# Altium PCB NB3000XN.PcbDoc (part 50 of 71)
Units mil, origin at the board's own origin, x right, y up, seen from the top; angles counter-clockwise.
Board outline 9527.56 x 6929.77 mil, 6 copper layers (Top Layer, GND+SHIELD, MidLayer1, MidLayer2, P2 - 3V3+5V0, Bottom Layer), stack 62.375 mil thick; 832 components, 1027 nets, 4655 pads, 4981 vias.
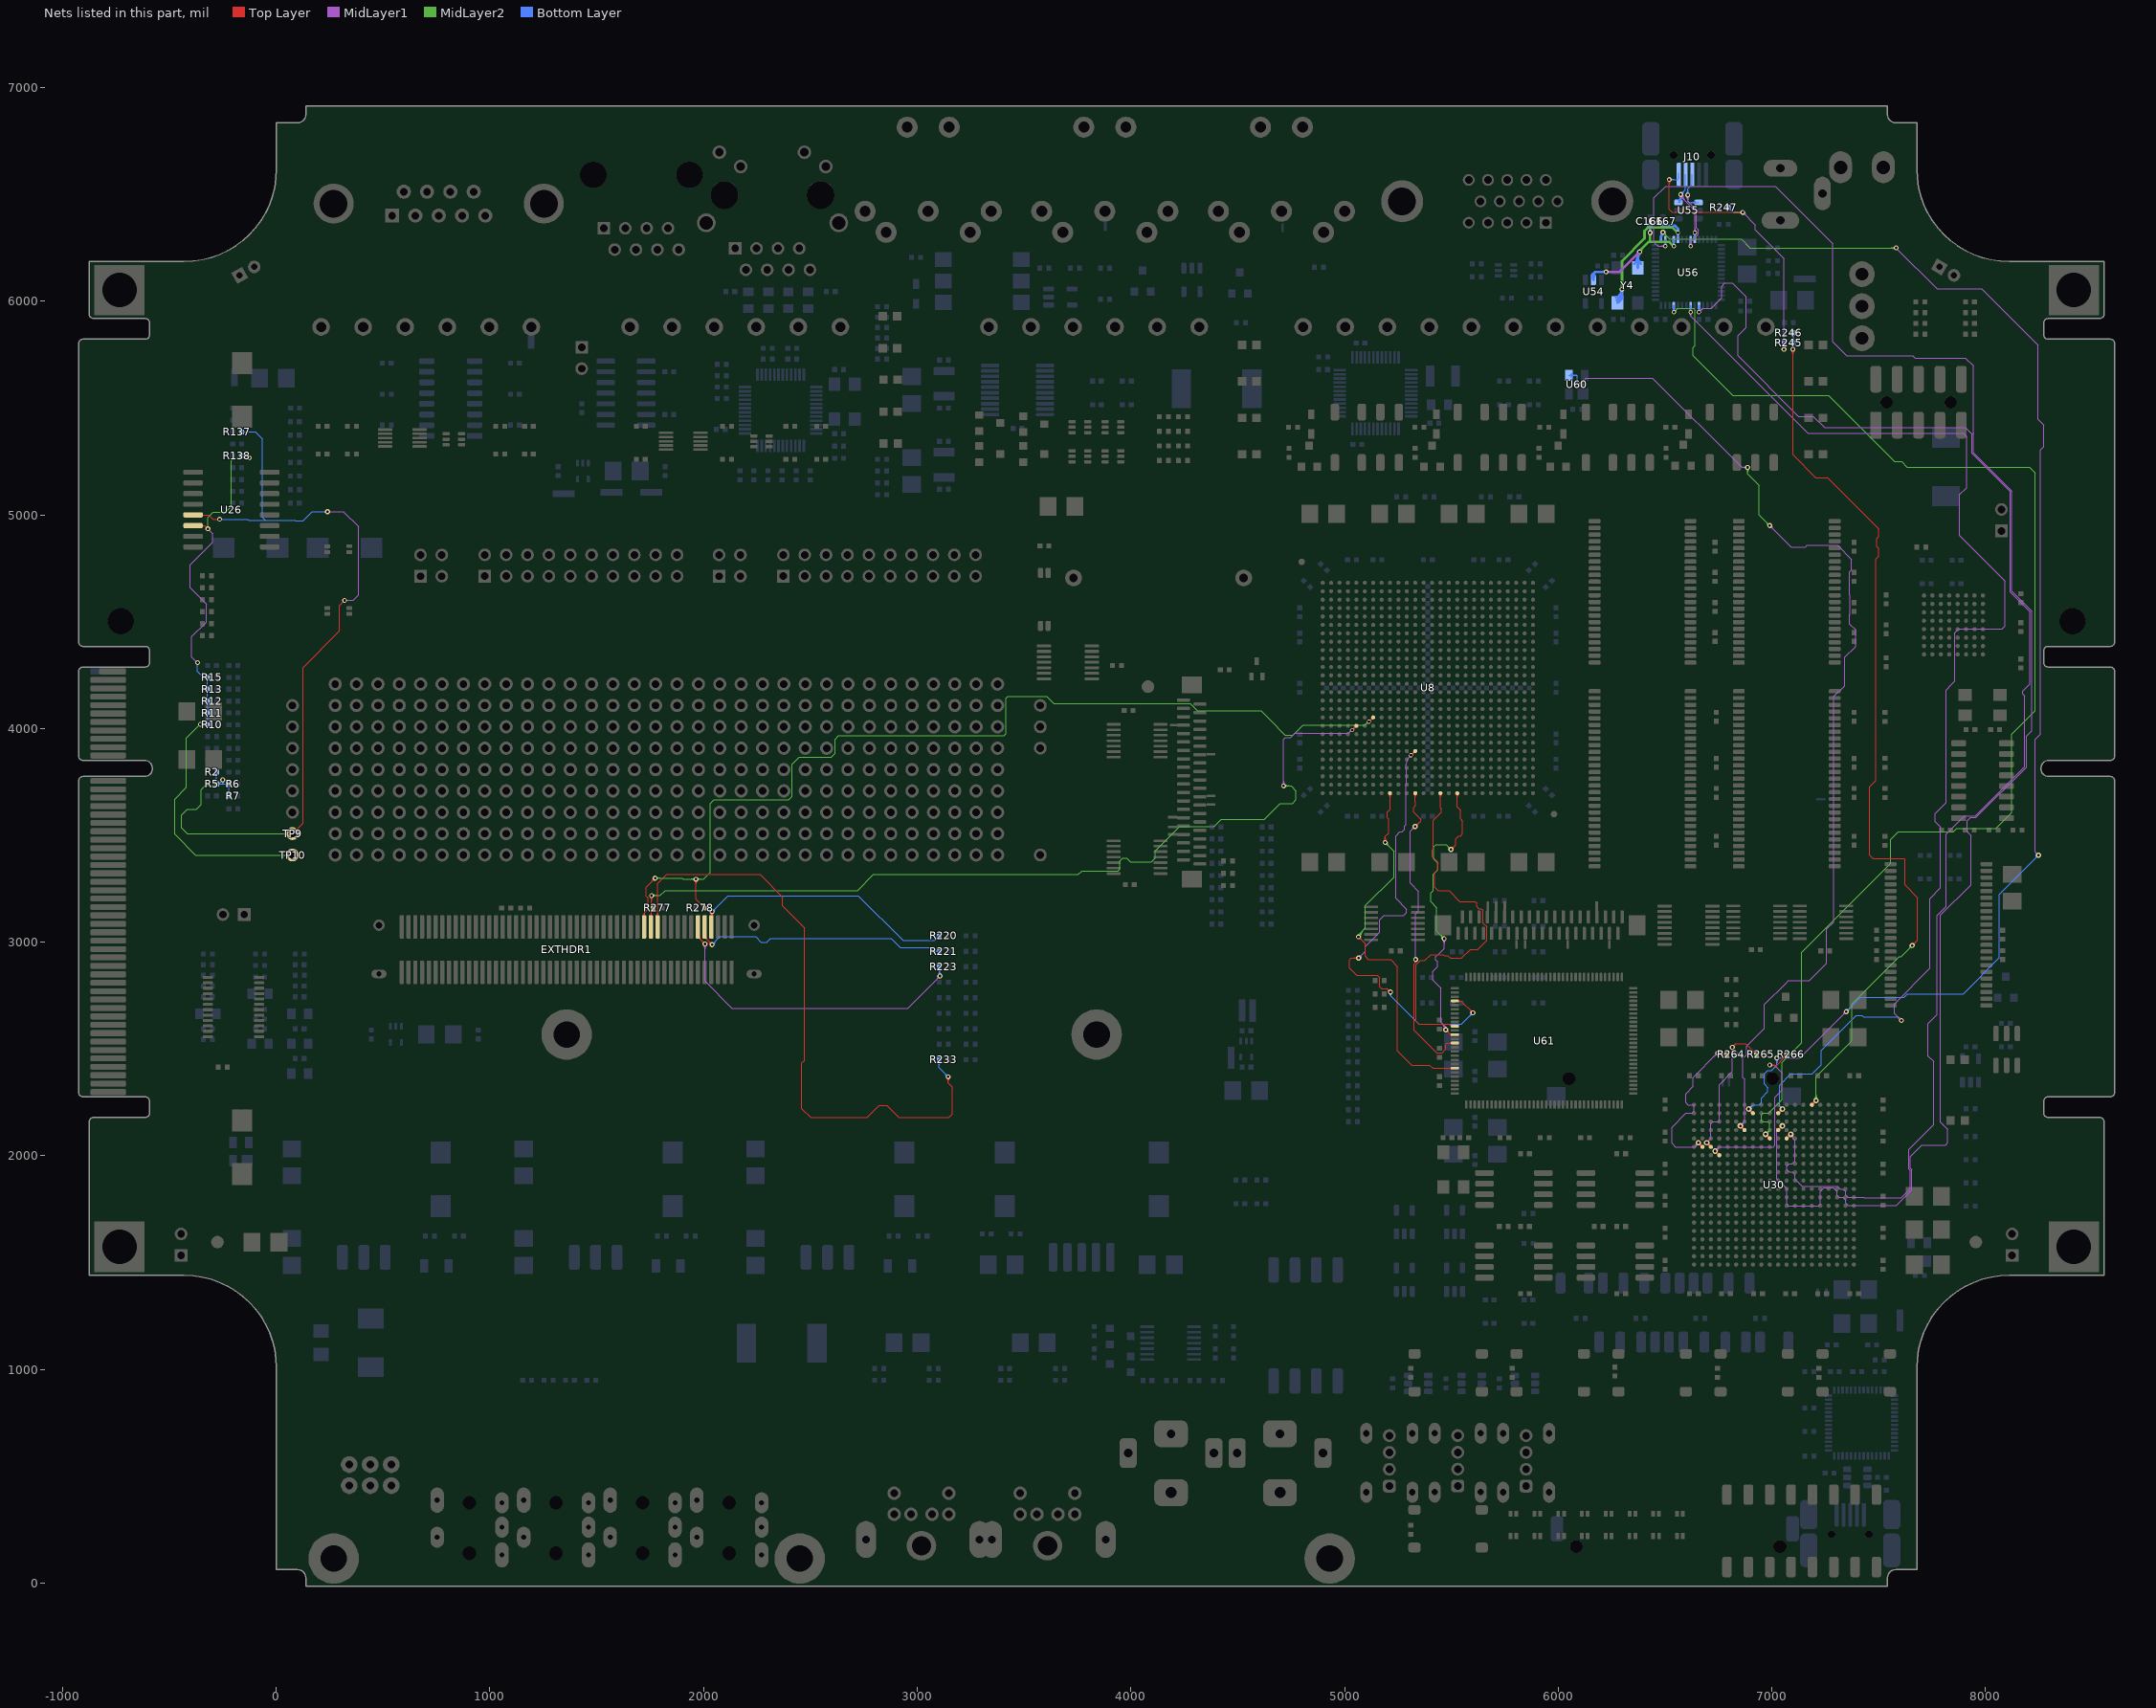
[diagram p54: the nets of this part, all layers, seen from the top]

## Via types
v1: diameter 23, hole 11.81, Top Layer to Bottom Layer, 3672 vias
v2: diameter 26, hole 11.81, Top Layer to Bottom Layer, 461 vias
v3: diameter 19, hole 11.81, Top Layer to Bottom Layer, tented both sides, 396 vias
v4: diameter 23.62, hole 11.81, Top Layer to Bottom Layer, 288 vias
v5: diameter 20, hole 11.81, Top Layer to Bottom Layer, 91 vias
v6: diameter 23, hole 11.81, Top Layer to Bottom Layer, tented both sides, 50 vias
v7: diameter 31, hole 11.81, Top Layer to Bottom Layer, 15 vias
v8: diameter 27.56, hole 11.81, Top Layer to Bottom Layer, tented both sides, 4 vias
v9: diameter 29, hole 11.81, Top Layer to Bottom Layer, 3 vias
v10: diameter 21, hole 11.81, Top Layer to Bottom Layer, 1 vias

## Nets (pads, with @x,y where several pads share a name; then routed paths per layer and width w, separated by ;. In a path a pad name is that pad's centre, name@x,y a point inside that pad or via, vN(x,y) a via of type N, cw(c..) or ccw(c..) an arc to the next point about the centre after c; other vN are vias at no path point) (continued)
HOST_USB.PKTEND: U30.L5 U56.39 | length 6330.3
  Top Layer w8: v2@6970.63,2092.22 cw(c6970.63,2070.49) 6985.99,2085.86 cw(c7001.36,2101.22) v2@6979.63,2101.22 ; v2(6970.63,2101.22) U30.L5@6990.31,2081.54 ; U30.L5@6984.47,2081.54 ccw(c6970.37,2081.54) 6980.34,2091.51 ccw(c6990.31,2101.48) U30.L5@6990.31,2087.38
  MidLayer2 w4: v5(6541.1,5949.34) 6557.66,5965.9 6632.66,5965.9 6640.19,5958.37 6640.19,5792.37 6631.86,5784.04 6631.86,5744.69 6818.17,5558.37 7265.19,5558.37 7573.52,5250.04 7606.86,5250.04 7632.9,5224 8204.69,5224 8231.86,5196.83 8231.86,4082.75 8122.86,3973.75 8122.86,3607.71 8048.52,3533.37 7865.19,3533.37 7848.52,3516.71 7591.86,3516.71 7556.86,3481.71 7556.86,3369.08 7139.86,2952.08 7139.86,2530.06 7048.52,2438.73 7048.52,2263.71 6984.86,2200.04 6959.19,2200.04 6950.86,2191.71 6950.86,2161.71 6952.86,2159.71 6981.86,2159.71 6990.19,2151.37 6990.19,2120.78 v2(6970.63,2101.22) ; v5@6541.1,5957.34 ccw(c6541.1,5976.65) 6554.76,5963 ccw(c6568.42,5949.34) v5@6549.1,5949.34 ; v2@6970.63,2108.22 ccw(c6970.63,2125.12) 6982.58,2113.17 ccw(c6994.53,2101.22) v2@6977.63,2101.22 ; v2@6970.63,2112.22 ccw(c6970.63,2138.78) 6989.41,2120 ccw(c7008.18,2101.22) v2@6981.63,2101.22
  Bottom Layer w8: v5@6536.86,5953.58 ccw(c6526.62,5963.82) 6541.1,5963.82 ccw(c6555.59,5963.82) v5@6545.34,5953.58 ; v5(6541.1,5949.34) U56.39@6541.1,5980.67
HOST_USB.RD_N: U30.N2 U56.1 | length 7277.6
  Top Layer w8: v2@6891.89,2210.33 cw(c6891.89,2188.6) 6907.25,2203.97 cw(c6922.62,2219.33) v2@6900.89,2219.33 ; v2(6891.89,2219.33) U30.N2@6911.57,2199.65 ; U30.N2@6905.73,2199.65 ccw(c6891.63,2199.65) 6901.6,2209.62 ccw(c6911.57,2219.59) U30.N2@6911.57,2205.49
  MidLayer1 w4: v1(7023.52,2458.37) 7131.86,2458.37 v1(7348.52,2675.04) ; v1@7027.41,2454.49 cw(c7036.8,2445.1) 7036.8,2458.37 cw(c7036.8,2471.65) v1@7027.41,2462.26 ; v1@7030.24,2451.66 cw(c7046.46,2435.44) 7046.46,2458.37 cw(c7046.46,2481.31) v1@7030.24,2465.09 ; v1@7339.02,2675.04 cw(c7316.09,2675.04) 7332.31,2658.82 cw(c7348.52,2642.61) v1@7348.52,2665.54 ; v1@7343.02,2675.04 cw(c7329.75,2675.04) 7339.14,2665.65 cw(c7348.52,2656.26) v1@7348.52,2669.54 ; v1(7581.86,6250.04) 7773.52,6058.37 7981.63,6058.37 8245,5795 8245,5448.52 8273.52,5420 8273.52,5320 8256.86,5303.33 8256.86,3974.43 8231.52,3949.1 8231.52,3424.04 v1(8248.52,3407.04) ; v1@8239.02,3407.04 ccw(c8216.09,3407.04) 8232.31,3423.26 ccw(c8248.52,3439.48) v1@8248.52,3416.54 ; v1@8243.02,3407.04 ccw(c8229.75,3407.04) 8239.14,3416.43 ccw(c8248.52,3425.82) v1@8248.52,3412.54
  MidLayer2 w4: v1@6490.19,6313.87 cw(c6490.19,6290.94) 6506.41,6307.16 cw(c6522.63,6323.37) v1@6499.69,6323.37 ; v1@6490.19,6317.87 cw(c6490.19,6304.6) 6499.58,6313.99 cw(c6508.97,6323.37) v1@6495.69,6323.37 ; v1(6490.19,6323.37) 6521.86,6291.71 6856.86,6291.71 6898.52,6250.04 v1(7581.86,6250.04) ; v1@7575.14,6243.32 ccw(c7558.92,6227.11) 7558.92,6250.04 ccw(c7558.92,6272.98) v1@7575.14,6256.76 ; v1@7577.97,6246.15 ccw(c7568.58,6236.76) 7568.58,6250.04 ccw(c7568.58,6263.32) v1@7577.97,6253.93
  Bottom Layer w4: U56.1@6479.22,6303.09 ccw(c6472.39,6309.92) 6482.05,6309.92 ccw(c6491.7,6309.92) U56.1@6484.88,6303.09 ; U56.1@6482.05,6288.37 cw(c6516.09,6288.37) v1@6495.84,6315.74 ; U56.1@6482.05,6289.33 6482.05,6315.23 v1(6490.19,6323.37) ; U56.1@6482.05,6296.31 cw(c6510.22,6296.31) v1@6493.46,6318.95 ; U56.1@6482.05,6304.24 cw(c6504.35,6304.24) v1@6491.08,6322.17 ; 6482.05,6312.18 cw(c6498.47,6312.18) v1@6488.7,6325.38 ; v2(6891.89,2219.33) 6910.93,2238.37 6940.19,2238.37 6951.52,2249.71 6951.52,2269.71 6981.86,2300.04 6981.86,2320.04 6965.19,2336.71 6965.19,2383.37 6981.86,2400.04 6998.52,2400.04 7023.52,2425.04 v1(7023.52,2458.37) ; v2@6891.89,2226.33 ccw(c6891.89,2243.23) 6903.84,2231.28 ccw(c6915.79,2219.33) v2@6898.89,2219.33 ; v2@6891.89,2230.33 ccw(c6891.89,2256.89) 6910.67,2238.11 ccw(c6929.45,2219.33) v2@6902.89,2219.33 ; v1@7016.81,2451.66 cw(c7000.59,2435.44) 7023.52,2435.44 cw(c7046.46,2435.44) v1@7030.24,2451.66 ; v1@7019.64,2454.49 cw(c7010.25,2445.1) 7023.52,2445.1 cw(c7036.8,2445.1) v1@7027.41,2454.49 ; v1(7348.52,2675.04) 7415.19,2741.71 7618.17,2741.71 7635.17,2758.71 7895.88,2758.71 8065.19,2928.02 8065.19,3223.71 v1(8248.52,3407.04) ; v1@7348.52,2680.54 ccw(c7348.52,2693.82) 7357.91,2684.43 ccw(c7367.3,2675.04) v1@7354.02,2675.04 ; v1@7348.52,2684.54 ccw(c7348.52,2707.48) 7364.74,2691.26 ccw(c7380.96,2675.04) v1@7358.02,2675.04 ; v1@8239.02,3407.04 cw(c8216.09,3407.04) 8232.31,3390.82 cw(c8248.52,3374.61) v1@8248.52,3397.54 ; v1@8243.02,3407.04 cw(c8229.75,3407.04) 8239.14,3397.65 cw(c8248.52,3388.26) v1@8248.52,3401.54
HOST_USB.READY: U30.J5 U56.33 | length 6901
  Top Layer w8: U30.J5@7069.06,2081.54 v2(7088.74,2101.22) ; U30.J5@7069.06,2087.38 ccw(c7069.06,2101.48) 7079.03,2091.51 ccw(c7089,2081.54) U30.J5@7074.9,2081.54 ; v2@7079.74,2101.22 cw(c7058.01,2101.22) 7073.38,2085.86 cw(c7088.74,2070.49) v2@7088.74,2092.22
  MidLayer1 w4: v5(6659.21,5949.34) 6676.58,5966.71 6715.86,5966.71 6765.19,6016.04 6765.19,6070 6780.19,6085 6815,6085 6880,6020 6880,5877.69 6841,5838.69 6841,5744.49 7125.14,5460.35 7194.18,5460.35 7246.15,5408.37 7905.23,5408.37 7934.28,5379.32 7936,5377.6 7936,5287.56 8115.19,5108.37 8115.19,4640 8208.52,4546.67 8208.52,4208.73 8175,4175.2 8175,4162.13 8183.19,4153.94 8183.19,3822.13 8150.03,3788.97 7952.43,3591.37 7901.17,3591.37 7815.19,3505.39 7815.19,3166.71 7773.52,3125.04 7773.52,2661.08 7731.52,2619.08 7731.52,2467.04 7756.86,2441.71 7756.86,2145.71 7640.52,2029.37 7640.52,1939.22 7647.5,1932.25 7647.5,1846 7605,1803.5 7535,1803.5 7432.63,1803.5 7430,1806.13 7356.96,1806.13 7345.33,1817.76 7345.33,1832.13 7332.83,1844.63 7320.6,1844.63 7315.19,1850.04 7306.86,1858.37 7141.19,1858.37 7108.36,1891.21 7108.36,1911.62 7095.24,1924.74 7080.87,1924.74 7069.74,1935.87 7069.74,1951.61 7080.87,1962.74 7095.24,1962.74 7108.36,1975.86 7108.36,2072.27 7099.02,2081.6 7098.92,2081.6 7098.92,2091.04 v2(7088.74,2101.22) ; v5@6659.21,5957.34 ccw(c6659.21,5976.66) 6672.87,5963 ccw(c6686.52,5949.34) v5@6667.21,5949.34 ; v2@7088.44,2094.23 cw(c7087.98,2083.29) 7098.92,2083.29 ; v2@7088.61,2098.22 cw(c7088.15,2087.47) 7098.92,2087.47 ; v2@7088.78,2102.22 cw(c7088.33,2091.64) 7098.92,2091.64
  Bottom Layer w8: v5@6654.97,5953.58 ccw(c6644.73,5963.82) 6659.21,5963.82 ccw(c6673.7,5963.82) v5@6663.45,5953.58 ; v5(6659.21,5949.34) U56.33@6659.21,5980.67
HOST_USB.RESET_N: U30.P4 U60.3 | length 5349.1
  Top Layer w8: v2@6852.52,2131.59 cw(c6852.52,2109.86) 6867.88,2125.23 cw(c6883.25,2140.59) v2@6861.52,2140.59 ; v2(6852.52,2140.59) U30.P4@6872.2,2120.91 ; U30.P4@6866.36,2120.91 ccw(c6852.26,2120.91) 6862.23,2130.88 ccw(c6872.2,2140.85) U30.P4@6872.2,2126.75
  MidLayer1 w4: v1@6104.86,5620.21 ccw(c6104.86,5633.49) 6114.25,5624.1 ccw(c6123.64,5614.71) v1@6110.36,5614.71 ; 6104.86,5624.21 ccw(c6104.86,5647.14) 6121.07,5630.93 ccw(c6137.29,5614.71) v1@6114.36,5614.71 ; v1(6105,5610) 6105,5614.56 6104.86,5614.71 6130.15,5640 6441.29,5640 6858.92,5222.37 v1(6886.86,5222.37) ; v2(6852.52,2140.59) 6852.52,2141.71 6872.86,2162.04 6872.86,2358.37 6865.19,2366.04 6865.19,2457.37 6881.86,2474.04 6881.86,2514.34 6965.19,2597.67 6965.19,2708.37 7069.5,2812.68 7076.82,2820 7176.21,2820 7256.86,2900.65 7256.86,3061.35 7290.19,3094.69 7290.19,4149.69 7340.86,4200.36 7340.86,4333.48 7391.86,4384.48 7391.86,4461.83 7364.52,4489.16 7364.52,4533.37 7365.19,4534.04 7365.19,4625.04 7364.52,4625.71 7364.52,4732.71 7373.52,4741.71 7373.52,4791.71 7306.86,4858.37 7165.19,4858.37 7156.86,4850.04 7090.19,4850.04 7077.48,4862.75 v1(6990.19,4950.04) ; v2@6852.52,2147.59 ccw(c6852.52,2161.8) 6862.57,2151.75 ; v2@6852.52,2151.59 ccw(c6852.52,2175.46) 6869.4,2158.58 ; v2@6859.52,2140.59 cw(c6879.11,2140.59) 6865.26,2154.44 ; v2@6863.52,2140.59 cw(c6892.76,2140.59) 6872.08,2161.27 ; v1@6880.14,5215.66 ccw(c6863.92,5199.44) 6863.92,5222.37 ccw(c6863.92,5245.31) v1@6880.14,5229.09 ; v1@6882.97,5218.49 ccw(c6873.58,5209.1) 6873.58,5222.37 ccw(c6873.58,5235.65) v1@6882.97,5226.26 ; v1@6990.19,4940.54 cw(c6990.19,4917.61) 7006.41,4933.82 cw(c7022.63,4950.04) v1@6999.69,4950.04 ; v1@6990.19,4944.54 cw(c6990.19,4931.26) 6999.58,4940.65 cw(c7008.97,4950.04) v1@6995.69,4950.04
  MidLayer2 w4: v1@6880.14,5215.66 cw(c6863.92,5199.44) 6886.86,5199.44 cw(c6909.79,5199.44) v1@6893.57,5215.66 ; v1@6882.97,5218.49 cw(c6873.58,5209.1) 6886.86,5209.1 cw(c6900.14,5209.1) v1@6890.75,5218.49 ; v1(6886.86,5222.37) 6886.86,5191.71 6940.19,5138.37 6940.19,5000.04 v1(6990.19,4950.04) ; v1@6980.69,4950.04 ccw(c6957.76,4950.04) 6973.97,4966.26 ccw(c6990.19,4982.48) v1@6990.19,4959.54 ; v1@6984.69,4950.04 ccw(c6971.41,4950.04) 6980.8,4959.43 ccw(c6990.19,4968.82) v1@6990.19,4955.54
  Bottom Layer w4: U60.3@6049.65,5653.31 6086.69,5653.31 ; U60.3@6055.19,5647.94 cw(c6067.83,5635.73) 6067.83,5653.31 cw(c6067.83,5670.89) U60.3@6055.19,5658.67 ; U60.3@6058.07,5645.17 cw(c6077.26,5626.62) 6077.26,5653.31 cw(c6077.26,5680) U60.3@6058.07,5661.45 ; U60.3@6060.95,5642.39 cw(c6086.69,5617.51) 6086.69,5653.31 ; U60.3@6060.95,5664.23 ccw(c6086.69,5689.11) 6086.69,5653.31 ; v1(6105,5610) 6090,5625 6090,5650 6086.69,5653.31
HOST_USB.SLOE: U30.K2 U56.35 | length 5896.7
  Top Layer w8: U30.K2@7029.69,2199.65 v2(7049.37,2219.33) ; U30.K2@7029.69,2205.49 ccw(c7029.69,2219.59) 7039.66,2209.62 ccw(c7049.63,2199.65) U30.K2@7035.53,2199.65 ; v2@7040.37,2219.33 cw(c7018.64,2219.33) 7034.01,2203.97 cw(c7049.37,2188.6) v2@7049.37,2210.33
  MidLayer1 w4: v5@6614.57,5943.32 cw(c6604.41,5931.7) 6619.84,5931.7 ; v5(6619.84,5949.34) 6619.84,5931.7 ; v5@6625.11,5943.32 ccw(c6635.28,5931.7) 6619.84,5931.7 ; v1@7597.36,2633.37 ccw(c7574.42,2633.37) 7590.64,2649.59 ccw(c7606.86,2665.81) v1@7606.86,2642.87 ; v1@7601.36,2633.37 ccw(c7588.08,2633.37) 7597.47,2642.76 ccw(c7606.86,2652.15) v1@7606.86,2638.87 ; v1(7606.86,2633.37) 7573.19,2667.04 7573.19,2710.41 7740.52,2877.75 7740.52,3204.37 7790.19,3254.04 7790.19,3540 7765.19,3565 7765.19,3603.04 7815.19,3653.04 7815.19,4180.71 7842.89,4208.41 7856.52,4222.04 7856.52,4449.71 7865.19,4458.37 7873.52,4466.71 8077.23,4466.71 8090.52,4480 8090.52,4691.37 8065.19,4716.71 7879.5,4902.4 7879.5,5094.72 7912,5127.23 7912,5367.66 7896.29,5383.37 7168.17,5383.37 6619.84,5931.7
  Bottom Layer w4: v2(7049.37,2219.33) 7036.86,2231.84 7036.86,2331.04 7089.19,2383.37 7189.19,2383.37 7231.86,2426.04 7231.86,2494.37 7394.19,2656.71 7422.21,2656.71 7428.88,2650.04 ; 7428.92,2650 7428.88,2650.04 ; v1@7597.36,2633.37 ccw(c7574.42,2633.37) 7590.64,2649.59 ccw(c7606.86,2665.81) v1@7606.86,2642.87 ; v1@7601.36,2633.37 ccw(c7588.08,2633.37) 7597.47,2642.76 ccw(c7606.86,2652.15) v1@7606.86,2638.87 ; v1(7606.86,2633.37) 7590.19,2650.04 7428.88,2650.04
  Bottom Layer w8: v5@6615.6,5953.58 ccw(c6605.36,5963.82) 6619.84,5963.82 ccw(c6634.33,5963.82) v5@6624.09,5953.58 ; v5(6619.84,5949.34) U56.35@6619.84,5980.67
HOST_USB.VBUS: R245.1 R246.1 U30.F1 | length 4741.7
  Top Layer w4: v1@7091.81,5768.66 cw(c7075.59,5752.44) 7098.52,5752.44 cw(c7121.46,5752.44) v1@7105.24,5768.66 ; v1@7094.64,5771.49 cw(c7085.25,5762.1) 7098.52,5762.1 cw(c7111.8,5762.1) v1@7102.41,5771.49 ; v1(7098.52,5775.37) 7098.52,5281.48 7204.96,5175.04 7259.84,5175.04 7500.19,4934.69 7500.19,4898.01 7491.19,4889 7491.19,4851 7500.19,4841.99 7500.19,4807.73 7486.19,4793.73 7486.19,3756.04 7456.86,3726.71 7456.86,3408.37 7473.52,3391.71 7618.52,3391.71 7623.52,3386.71 7623.52,3267.39 7681.86,3209.06 7681.86,3009.71 v1(7656.86,2984.71) ; v1@7656.86,2990.21 ccw(c7656.86,3003.49) 7666.25,2994.1 ccw(c7675.64,2984.71) v1@7662.36,2984.71 ; v1@7656.86,2994.21 ccw(c7656.86,3017.14) 7673.07,3000.93 ccw(c7689.29,2984.71) v1@7666.36,2984.71
  Top Layer w8: U30.F1@7187.17,2239.02 v2(7206.85,2258.7) ; U30.F1@7187.17,2244.86 ccw(c7187.17,2258.96) 7197.14,2248.99 ccw(c7207.11,2239.02) U30.F1@7193.01,2239.02 ; v2@7197.85,2258.7 cw(c7176.12,2258.7) 7191.49,2243.34 cw(c7206.85,2227.97) v2@7206.85,2249.7
  MidLayer2 w4: v2@7199.07,2266.48 ccw(c7180.29,2285.26) 7206.85,2285.26 ccw(c7233.41,2285.26) v2@7214.63,2266.48 ; v2@7201.9,2263.65 ccw(c7189.95,2275.6) 7206.85,2275.6 ccw(c7223.75,2275.6) v2@7211.8,2263.65 ; v2(7206.85,2258.7) 7206.85,2370.35 7374.19,2537.69 7374.19,2710.37 7597.19,2933.37 7605.52,2933.37 v1(7656.86,2984.71) ; v1@7647.36,2984.71 cw(c7624.42,2984.71) 7640.64,2968.49 cw(c7656.86,2952.27) v1@7656.86,2975.21 ; v1@7651.36,2984.71 cw(c7638.08,2984.71) 7647.47,2975.32 cw(c7656.86,2965.93) v1@7656.86,2979.21
  Bottom Layer w4: v1@7091.81,5782.09 ccw(c7069.17,5804.72) R245.1@7101.18,5804.72 ; R245.1@7094.59,5797.92 cw(c7078.68,5782.01) 7101.18,5782.01 cw(c7123.68,5782.01) R245.1@7107.77,5797.92 ; R245.1@7094.59,5812.08 ccw(c7078.68,5827.99) 7101.18,5827.99 ccw(c7123.68,5827.99) R245.1@7107.77,5812.08 ; R246.1@7094.59,5845.42 cw(c7078.68,5829.51) 7101.18,5829.51 cw(c7123.68,5829.51) R246.1@7107.77,5845.42 ; v1@7094.64,5779.26 ccw(c7078.83,5795.07) R245.1@7101.18,5795.07 ; R245.1@7097.42,5800.75 cw(c7088.34,5791.67) 7101.18,5791.67 cw(c7114.02,5791.67) R245.1@7104.94,5800.75 ; R245.1@7097.42,5809.25 ccw(c7088.34,5818.33) 7101.18,5818.33 ccw(c7114.02,5818.33) R245.1@7104.94,5809.25 ; R246.1@7097.42,5848.25 cw(c7088.34,5839.17) 7101.18,5839.17 cw(c7114.02,5839.17) R246.1@7104.94,5848.25 ; v1(7098.52,5775.37) 7101.18,5778.03 R245.1@7101.18,5805 R246.1@7101.18,5852.5 ; 7101.18,5791.9 ccw(c7115.04,5791.9) v1@7105.24,5782.09
HOST_USB.WR_N: U30.K4 U56.2 | length 8106.8
  Top Layer w8: U30.K4@7029.69,2120.91 v2(7049.37,2140.59) ; U30.K4@7029.69,2126.75 ccw(c7029.69,2140.85) 7039.66,2130.88 ccw(c7049.63,2120.91) U30.K4@7035.53,2120.91 ; v2@7040.37,2140.59 cw(c7018.64,2140.59) 7034.01,2125.23 cw(c7049.37,2109.86) v2@7049.37,2131.59
  MidLayer1 w4: v5@6496.08,6252.34 ccw(c6482.42,6238.69) 6482.42,6258 ccw(c6482.42,6277.31) v5@6496.08,6263.66 ; v5(6501.73,6258) 6467.23,6258 6448.52,6276.71 6448.52,6483.52 6504,6539 7015.63,6539 7285,6269.63 7285,5810 7350,5745 7660,5745 7670,5735 7905,5735 7942.81,5697.19 7942.81,5381.8 7944,5380.61 ; v2@7038.37,2140.59 cw(c7011.81,2140.59) 7030.59,2121.81 cw(c7049.37,2103.03) v2@7049.37,2129.59 ; v2@7042.37,2140.59 cw(c7025.47,2140.59) 7037.42,2128.64 cw(c7049.37,2116.69) v2@7049.37,2133.59 ; v2(7049.37,2140.59) 7023.82,2115.04 7023.82,1891.41 7069.52,1845.71 7069.52,1775.04 7077.86,1766.71 7218.19,1766.71 7226.52,1775.04 7226.52,1833.37 7243.19,1850.04 7288.52,1850.04 7305.19,1833.37 7305.19,1816.04 7315.19,1806.04 7332.05,1806.04 7345.33,1792.76 7345.33,1778.39 7356.46,1767.26 7582.51,1767.26 7655.5,1840.25 7655.5,1935.56 7648.52,1942.54 7648.52,1996.71 7701.86,2050.04 7812.86,2050.04 7823.52,2060.71 7823.52,2125.04 7790.19,2158.37 7790.19,3126.37 7931.86,3268.04 7931.86,3500.04 7915.19,3516.71 7915.19,3569.37 7929.19,3583.37 7955.75,3583.37 8191.19,3818.82 8191.19,3965.33 8216.52,3990.67 8216.52,4549.98 8123.19,4643.31 8123.19,5111.69 7944,5290.88 7944,5380.61 ; 7944,5380.92 7944,5380.61
  Bottom Layer w8: v5@6497.49,6262.24 ccw(c6487.25,6272.49) 6501.73,6272.49 ccw(c6516.22,6272.49) v5@6505.97,6262.24 ; v5(6501.73,6258) U56.2@6501.73,6289.33
HOST_USB.XTALIN: C167.1 U56.5 Y4.3 | length 905.6
  MidLayer2 w12: v1@6294.64,6059.93 ccw(c6285.25,6069.32) 6298.52,6069.32 ccw(c6311.8,6069.32) v1@6302.41,6059.93 ; v1(6298.52,6056.04) 6298.52,6188.52 6404.39,6294.39 6404.39,6329.39 6420,6345 6536.45,6345 v5(6560.79,6320.66)
  Bottom Layer w8: v5@6556.54,6316.42 cw(c6546.3,6306.18) 6560.79,6306.18 cw(c6575.27,6306.18) v5@6565.03,6316.42 ; U56.5@6560.79,6289.33 v5(6560.79,6320.66)
  Bottom Layer w12: Y4.3@6270.85,6017.95 ccw(c6258.47,6056.04) v1(6298.52,6056.04) 6298.52,6014.52 Y4.3@6277.5,5993.5 ; Y4.3@6274.56,6006.53 ccw(c6263.84,6039.52) 6298.52,6039.52 ; Y4.3@6278.27,5995.12 ccw(c6269.21,6023) Y4.3@6298.52,6023 ; v1@6294.64,6052.15 cw(c6285.25,6042.76) 6298.52,6042.76 cw(c6311.8,6042.76) v1@6302.41,6052.15 ; C167.1@6490,6354.33 6545.67,6354.33 6560.79,6339.21 v5(6560.79,6320.66) ; C167.1@6494.11,6350.22 cw(c6504.03,6340.3) 6504.03,6354.33 cw(c6504.03,6368.36) C167.1@6494.11,6358.44
HOST_USB.XTALOUT: C166.1 U54.2 U56.4 Y4.1 | length 1026.5
  MidLayer1 w12: v1(6224.15,6137.69) 6287.84,6137.69 v1(6381.86,6231.71) ; v1@6228.04,6133.8 cw(c6237.43,6124.41) 6237.43,6137.69 cw(c6237.43,6150.97) v1@6228.04,6141.58 ; v1@6376.36,6231.71 cw(c6363.08,6231.71) 6372.47,6222.32 cw(c6381.86,6212.93) v1@6381.86,6226.21
  MidLayer2 w12: v1(6381.86,6231.71) 6381.86,6236.86 6423,6278 6430,6278 ; v1@6387.36,6231.71 cw(c6413.07,6231.71) 6394.89,6249.89 ; v1@6426.3,6317.15 cw(c6416.91,6307.76) 6430.19,6307.76 cw(c6443.47,6307.76) v1@6434.08,6317.15 ; v1(6430.19,6321.04) 6430.19,6278.19 6430,6278 ; v5(6541.1,6258) 6521.1,6278 6430,6278
  Bottom Layer w8: v5@6536.86,6262.24 ccw(c6526.62,6272.49) 6541.1,6272.49 ccw(c6555.59,6272.49) v5@6545.35,6262.24 ; v5(6541.1,6258) U56.4@6541.1,6289.33
  Bottom Layer w12: U54.2@6159.66,6110.77 cw(c6171,6117.41) 6161.71,6126.71 ; U54.2@6160.89,6118.01 ccw(c6150.97,6127.93) 6165,6127.93 ccw(c6179.03,6127.93) U54.2@6169.11,6118.01 ; U54.2@6165,6100.12 6165,6130 6172.69,6137.69 ; U54.2@6170.01,6116.84 cw(c6184.85,6125.53) 6172.69,6137.69 ; v1@6220.26,6133.8 ccw(c6210.87,6124.41) 6210.87,6137.69 ccw(c6210.87,6150.97) v1@6220.26,6141.58 ; v1(6224.15,6137.69) 6172.69,6137.69 ; Y4.1@6357.3,6175.7 ccw(c6320.59,6212.41) 6372.5,6212.41 ccw(c6424.41,6212.41) Y4.1@6387.7,6175.7 ; Y4.1@6372.5,6156.5 6372.5,6222.35 v1(6381.86,6231.71) ; 6372.5,6195.84 cw(c6417.73,6195.84) v1@6385.75,6227.82 ; 6372.5,6224.81 cw(c6388.76,6224.81) v1@6377.26,6236.3 ; C166.1@6425.89,6350.22 cw(c6415.97,6340.3) 6430,6340.3 cw(c6444.03,6340.3) C166.1@6434.11,6350.22 ; v1@6426.3,6324.93 ccw(c6417.37,6333.86) 6430,6333.86 ; 6430,6334.78 ccw(c6443.93,6334.78) v1@6434.08,6324.93 ; C166.1@6430,6354.33 6430,6321.23 v1(6430.19,6321.04)
HOST_VS0: R264.1 U30.W6 | length 992.6
  Top Layer w4: v1(6746.52,2481.37) 6765,2481.37 ; v1@6754.25,2475.85 cw(c6765,2468.16) 6765,2481.37 ; v1@6754.25,2486.9 ccw(c6765,2494.59) 6765,2481.37 ; R264.1@6781.07,2469.82 ccw(c6771.38,2463.33) 6771.38,2475 ; R264.1@6781.07,2480.18 cw(c6771.38,2486.67) 6771.38,2475 ; R264.1@6788.82,2475 6771.38,2475 ; 6765,2481.37 6771.38,2475
  Top Layer w8: v2@6655.67,2052.85 cw(c6655.67,2031.12) 6671.03,2046.49 cw(c6686.4,2061.85) v2@6664.67,2061.85 ; v2(6655.67,2061.85) U30.W6@6675.35,2042.17 ; U30.W6@6669.51,2042.17 ccw(c6655.41,2042.17) 6665.38,2052.14 ccw(c6675.35,2062.11) U30.W6@6675.35,2048.01
  MidLayer1 w4: 6642.52,2044.04 ccw(c6633.4,2053.17) v2@6645.42,2057.85 ; 6644.85,2046.37 cw(c6655.67,2035.55) v2@6655.67,2050.85 ; 6646.85,2048.37 ccw(c6639.63,2055.6) v2@6649.15,2059.31 ; v2(6655.67,2061.85) 6656.86,2061.85 6656.86,2058.37 6640.19,2041.71 6548.52,2041.71 6531.86,2058.37 6531.86,2133.37 6598.52,2200.04 6627.19,2200.04 6635.52,2208.37 6635.52,2236.71 6633.52,2238.71 6606.86,2238.71 6596.86,2248.71 6596.86,2290.04 6631.86,2325.04 6631.86,2366.71 v1(6746.52,2481.37) ; v1@6737.02,2481.37 cw(c6714.09,2481.37) 6730.31,2465.16 cw(c6746.52,2448.94) v1@6746.52,2471.87 ; v1@6741.02,2481.37 cw(c6727.75,2481.37) 6737.14,2471.99 cw(c6746.52,2462.6) v1@6746.52,2475.87
HOST_VS1: R265.1 U30.V6 | length 907.6
  Top Layer w4: v1(6815.19,2508.37) 6831.86,2525.04 6878.78,2525.04 R265.1@6928.82,2475 ; v1@6815.19,2513.87 ccw(c6815.19,2527.15) 6824.58,2517.76 ccw(c6833.97,2508.37) v1@6820.69,2508.37 ; v1@6815.19,2517.87 ccw(c6815.19,2540.81) 6831.41,2524.59 ccw(c6847.63,2508.37) v1@6824.69,2508.37 ; 6912.07,2491.75 ccw(c6928.82,2508.5) R265.1@6928.82,2484.81 ; 6913.26,2490.56 cw(c6898.19,2475.49) R265.1@6919.5,2475.49 ; R265.1@6918.9,2484.92 ccw(c6928.82,2494.84) R265.1@6928.82,2480.81 ; R265.1@6920.09,2483.73 cw(c6911.85,2475.49) R265.1@6923.5,2475.49
  Top Layer w8: v2@6695.04,2052.85 cw(c6695.04,2031.12) 6710.4,2046.49 cw(c6725.77,2061.85) v2@6704.04,2061.85 ; v2(6695.04,2061.85) U30.V6@6714.72,2042.17 ; U30.V6@6708.88,2042.17 ccw(c6694.78,2042.17) 6704.75,2052.14 ccw(c6714.72,2062.11) U30.V6@6714.72,2048.01
  MidLayer1 w4: v2(6695.04,2061.85) 6715.19,2082 6715.19,2152.04 6723.52,2160.37 6751.86,2160.37 6753.52,2162.04 6753.52,2333.37 6815.19,2395.04 v1(6815.19,2508.37) ; v1@6808.47,2501.66 cw(c6792.26,2485.44) 6815.19,2485.44 cw(c6838.13,2485.44) v1@6821.91,2501.66 ; v1@6811.3,2504.49 cw(c6801.91,2495.1) 6815.19,2495.1 cw(c6828.47,2495.1) v1@6819.08,2504.49
HOST_VS2: R266.1 U30.U7 | length 1108.6
  Top Layer w4: v1(6990.19,2425.04) 7023.52,2425.04 7060.19,2461.71 7068.82,2461.71 ; v1@6994.08,2421.15 cw(c7003.47,2411.76) 7003.47,2425.04 cw(c7003.47,2438.32) v1@6994.08,2428.93 ; v1@6996.91,2418.32 cw(c7013.13,2402.11) 7013.13,2425.04 cw(c7013.13,2447.98) v1@6996.91,2431.76 ; 7049.96,2451.48 ccw(c7026.93,2474.51) R266.1@7059.5,2474.51 ; 7056.79,2458.31 ccw(c7040.59,2474.51) R266.1@7063.5,2474.51 ; 7060.03,2461.55 cw(c7068.82,2452.76) R266.1@7068.82,2465.19 ; R266.1@7068.82,2475 7068.82,2461.71 ; 7068.82,2461.71 cw(c7072.95,2461.71) 7071.68,2465.64 ccw(c7072.95,2461.71) 7068.82,2461.71 ; 7068.82,2461.71 ccw(c7064.69,2461.71) 7065.96,2465.64 cw(c7064.69,2461.71) 7068.82,2461.71
  Top Layer w8: v2@6734.41,2013.48 cw(c6734.41,1991.75) 6749.77,2007.12 cw(c6765.14,2022.48) v2@6743.41,2022.48 ; v2(6734.41,2022.48) U30.U7@6754.09,2002.8 ; U30.U7@6748.25,2002.8 ccw(c6734.15,2002.8) 6744.12,2012.77 ccw(c6754.09,2022.74) U30.U7@6754.09,2008.64
  MidLayer1 w4: v2(6734.41,2022.48) 6753.64,2041.71 7006.9,2041.71 7015.19,2050 7015.19,2275.04 7048.52,2308.37 7048.52,2388.73 7012.21,2425.04 v1(6990.19,2425.04) ; v2@6734.41,2029.48 ccw(c6734.41,2046.38) 6746.36,2034.43 ccw(c6758.31,2022.48) v2@6741.41,2022.48 ; v2@6734.41,2033.48 ccw(c6734.41,2060.04) 6753.19,2041.26 ccw(c6771.96,2022.48) v2@6745.41,2022.48
HOSTUSB#.DMINUS: J10.2 U55.6 U56.9 | length 744.1
  MidLayer1 w4: v1@6571.02,6500.04 ccw(c6588.84,6500.04) 6576.24,6487.44 ; v1(6573.52,6500.04) 6573.52,6490.16 6639.53,6424.16 v5(6639.53,6320.66) ; v1@6575.02,6500.04 ccw(c6602.49,6500.04) 6583.07,6480.62 ; v1@6579.02,6500.04 ccw(c6616.15,6500.04) 6589.9,6473.79 ; v1@6583.02,6500.04 ccw(c6629.81,6500.04) 6596.73,6466.96 ; v5@6633.87,6326.32 ccw(c6620.21,6339.98) 6639.53,6339.98 ccw(c6658.84,6339.97) v5@6645.18,6326.32
  Bottom Layer w4: U55.6@6561.32,6471.62 ccw(c6538.71,6500) v1@6575,6500 ; U55.6@6562.76,6462.4 U55.6@6575,6474.65 ; U55.6@6563.81,6468.49 ccw(c6545.32,6491.7) v1@6575,6491.7 ; U55.6@6566.31,6465.36 ccw(c6551.94,6483.4) 6575,6483.4 ; v1@6567.01,6493.13 cw(c6549.54,6474.6) U55.6@6575,6474.6 ; U55.6@6568.8,6462.23 ccw(c6558.55,6475.1) U55.6@6575,6475.1 ; v1@6569.75,6496.04 cw(c6558.28,6483.87) 6575,6483.87 ; v1(6573.52,6500.04) 6596.5,6523.01 J10.2@6596.5,6594 ; v1@6573.52,6505.54 ccw(c6573.52,6518.82) 6582.91,6509.43 ccw(c6592.3,6500.04) v1@6579.02,6500.04 ; v1@6573.52,6509.54 ccw(c6573.52,6532.48) 6589.74,6516.26 ccw(c6605.96,6500.04) v1@6583.02,6500.04 ; U55.6@6575,6475.54 ccw(c6581.8,6475.54) U55.6@6576.99,6470.73 ; 6575,6480.67 cw(c6592.9,6480.67) v1@6580.24,6493.32 ; v1@6575,6500 U55.6@6575,6474.65
  Bottom Layer w8: v5@6635.28,6316.42 cw(c6625.04,6306.18) 6639.53,6306.18 cw(c6654.01,6306.18) v5@6643.77,6316.42 ; U56.9@6639.53,6289.33 v5(6639.53,6320.66)
HOSTUSB#.DPLUS: J10.3 U55.1 U56.8 | length 768.6
  MidLayer1 w4: v1@6599.47,6490.32 cw(c6583.26,6474.11) 6606.19,6474.11 cw(c6629.13,6474.11) v1@6612.91,6490.32 ; v1@6602.3,6493.15 cw(c6592.91,6483.76) 6606.19,6483.76 cw(c6619.47,6483.76) v1@6610.08,6493.15 ; v1(6606.19,6497.04) 6606.19,6468.81 6626.16,6448.84 6647.53,6427.47 6647.53,6343 6655.53,6335 6655.53,6314.03 6619.84,6278.35 v5(6619.84,6258) ; v5@6614.19,6263.66 ccw(c6600.53,6277.31) 6619.84,6277.31 ccw(c6639.16,6277.31) v5@6625.5,6263.66
  Bottom Layer w4: v1@6599.47,6490.32 cw(c6582.93,6473.78) 6606.33,6473.78 ; v1@6599.47,6503.76 ccw(c6583.26,6519.98) 6606.19,6519.98 ; v1@6602.3,6493.15 cw(c6592.58,6483.43) 6606.33,6483.43 ; v1@6602.3,6500.93 ccw(c6592.91,6510.32) 6606.19,6510.32 ccw(c6619.47,6510.32) v1@6610.08,6500.93 ; v1(6606.19,6497.04) 6606.33,6497.04 6606.33,6468.67 6612.6,6462.4 U55.1@6657.24,6462.4 ; 6606.33,6474.43 cw(c6628.8,6474.43) v1@6612.91,6490.32 ; 6606.33,6484.09 cw(c6619.14,6484.09) v1@6610.08,6493.15 ; v1@6612.91,6503.76 cw(c6629.13,6519.98) 6606.19,6519.98 ; J10.3@6627.99,6594 6627.99,6547.99 6606.19,6526.19 6606.19,6519.98 ; U55.1@6643.01,6454.07 ccw(c6622.9,6433.96) 6622.9,6462.4 ccw(c6622.9,6490.84) U55.1@6643.01,6470.73 ; U55.1@6645.84,6456.9 ccw(c6632.56,6443.62) 6632.56,6462.4 ccw(c6632.56,6481.18) U55.1@6645.84,6467.9
  Bottom Layer w8: v5@6615.6,6262.24 ccw(c6605.36,6272.49) 6619.84,6272.49 ccw(c6634.33,6272.49) v5@6624.09,6262.24 ; v5(6619.84,6258) U56.8@6619.84,6289.33
HOSTUSB#.VBUS: J10.1 R245.2 R247.1 | length 1801.4
  Top Layer w4: v1@6513.28,6563.28 cw(c6497.06,6547.06) 6520,6547.06 cw(c6542.93,6547.06) v1@6526.72,6563.28 ; v1@6516.11,6566.11 cw(c6506.72,6556.72) 6520,6556.72 cw(c6533.28,6556.72) v1@6523.89,6566.11 ; v1(6520,6570) 6520,6430 6533.29,6416.71 v1(6863.86,6416.71) ; v1@6857.14,6409.99 ccw(c6840.92,6393.77) 6840.92,6416.71 ccw(c6840.92,6439.64) v1@6857.14,6423.43 ; v1@6859.97,6412.82 ccw(c6850.58,6403.43) 6850.58,6416.71 ccw(c6850.58,6429.99) v1@6859.97,6420.6
  MidLayer1 w4: v1@6863.86,6407.21 cw(c6863.86,6384.27) 6880.07,6400.49 cw(c6896.29,6416.71) v1@6873.36,6416.71 ; v1@6863.86,6411.21 cw(c6863.86,6397.93) 6873.25,6407.32 cw(c6882.64,6416.71) v1@6869.36,6416.71 ; v1(6863.86,6416.71) 6923,6357.56 6923,6334.62 7056.86,6200.77 v1(7056.86,5775.04) ; v1@7050.14,5781.76 ccw(c7033.92,5797.98) 7056.86,5797.98 ccw(c7079.79,5797.98) v1@7063.57,5781.76 ; v1@7052.97,5778.93 ccw(c7043.58,5788.32) 7056.86,5788.32 ccw(c7070.14,5788.32) v1@7060.75,5778.93
  Bottom Layer w4: v1(6520,6570) 6560,6570 6565,6575 J10.1@6565,6600 ; v1@6523.89,6566.11 cw(c6533.28,6556.72) 6533.28,6570 cw(c6533.28,6583.28) v1@6523.89,6573.89 ; v1@6526.72,6563.28 cw(c6542.93,6547.06) 6542.93,6570 cw(c6542.93,6592.93) v1@6526.72,6576.72 ; R247.1@6795,6440 6818.29,6416.71 v1(6863.86,6416.71) ; R247.1@6796.18,6430.19 cw(c6796.18,6409.35) 6810.91,6424.09 ; R247.1@6796.18,6434.19 cw(c6796.18,6423.01) R247.1@6804.08,6430.92 ; R247.1@6801.5,6439.51 ccw(c6816,6439.51) R247.1@6805.75,6429.25 ; R247.1@6805.5,6439.51 ccw(c6829.66,6439.51) 6812.58,6422.42 ; v1@6857.14,6409.99 ccw(c6840.92,6393.77) 6840.92,6416.71 ccw(c6840.92,6439.64) v1@6857.14,6423.43 ; v1@6859.97,6412.82 ccw(c6850.58,6403.43) 6850.58,6416.71 ccw(c6850.58,6429.99) v1@6859.97,6420.6 ; R245.2@7055.54,5795.79 cw(c7053.75,5791.04) 7058.82,5791.04 ; v1(7056.86,5775.04) 7056.86,5789.08 7058.82,5791.04 ; R245.2@7058.82,5805 7058.82,5791.04 ; R245.2@7062.1,5795.79 ccw(c7063.89,5791.04) 7058.82,5791.04
I2C.SCL: EXTHDR1.25 R277.2 U8.V5 | length 4493.7
  Top Layer w4: EXTHDR1.25@1747.71,3122.62 ccw(c1725.64,3144.7) 1756.86,3144.7 ; v1@1750.14,3211.66 cw(c1733.92,3195.44) 1756.86,3195.44 cw(c1779.79,3195.44) v1@1763.57,3211.66 ; EXTHDR1.25@1750.54,3119.8 ccw(c1735.29,3135.04) 1756.86,3135.04 ; v1@1752.97,3214.49 cw(c1743.58,3205.1) 1756.86,3205.1 cw(c1770.14,3205.1) v1@1760.75,3214.49 ; EXTHDR1.25@1756.86,3075.04 v1(1756.86,3218.37) ; 1756.86,3127.86 ccw(c1764.26,3127.86) EXTHDR1.25@1759.03,3122.62 ; v3(5035.67,3993.15) U8.V5@5055.35,4012.83 ; v3@5043.17,3993.15 cw(c5061.28,3993.15) 5048.47,4005.95 ; v3@5043.17,3993.15 cw(c5061.28,3993.15) 5048.47,4005.95 ; U8.V5@5047.85,4012.83 cw(c5029.75,4012.83) 5042.55,4000.03 cw(c5055.35,3987.23) U8.V5@5055.35,4005.33 ; U8.V5@5048.01,4012.83 cw(c5030.29,4012.83) 5042.82,4000.3 cw(c5055.35,3987.77) U8.V5@5055.35,4005.49 ; 5048.47,4005.95 cw(c5035.67,4018.76) 5035.67,4000.65 ccw(c5035.67,4018.76) 5048.47,4005.95
  MidLayer1 w4: v1@4708.47,3738.09 ccw(c4692.26,3754.31) 4715.19,3754.31 ccw(c4738.13,3754.31) v1@4721.91,3738.09 ; v1@4711.3,3735.26 ccw(c4701.91,3744.65) 4715.19,3744.65 ccw(c4728.47,3744.65) v1@4719.08,3735.26 ; v1(4715.19,3731.37) 4715.19,3950.04 4723.52,3958.37 4749.04,3958.37 4768.31,3977.64 4860,3977.64 4870,3977.64 4918.62,3977.64 5012.16,3977.64 ccw(c5012.16,3991.69) 5022.09,3981.76 ; v3@5028.2,3993.8 cw(c5010.16,3995.38) 5021.8,3981.51 cw(c5033.44,3967.64) v3@5035.02,3985.68
  MidLayer2 w4: v1(1756.86,3218.37) 1797.06,3218.37 1820.39,3241.71 2720.54,3241.71 2795.54,3316.71 3753.88,3316.71 3771.17,3334 3939,3334 3948,3343 3948,3380 3961,3393 3980.56,3393 3998.52,3375.04 4096.52,3375.04 4115.19,3393.71 4115.19,3428.04 4228.86,3541.71 4390.19,3541.71 4423.52,3575.04 4624.52,3575.04 4699.52,3650.04 4756.52,3650.04 4773.52,3667.04 4773.52,3707.71 4749.86,3731.37 v1(4715.19,3731.37) ; v1@1760.75,3214.49 cw(c1770.14,3205.1) 1770.14,3218.37 cw(c1770.14,3231.65) v1@1760.75,3222.26 ; v1@1763.57,3211.66 cw(c1779.79,3195.44) 1779.79,3218.37 cw(c1779.79,3241.31) v1@1763.57,3225.09 ; v1@4719.08,3727.49 cw(c4728.47,3718.1) 4728.47,3731.37 cw(c4728.47,3744.65) v1@4719.08,3735.26 ; v1@4721.91,3724.66 cw(c4738.13,3708.44) 4738.13,3731.37 cw(c4738.13,3754.31) v1@4721.91,3738.09
I2C.SDA: EXTHDR1.27 R278.1 U8.U7 | length 5119.1
  Top Layer w4: EXTHDR1.27@1716.22,3122.62 ccw(c1702.56,3136.28) 1721.87,3136.28 ccw(c1741.19,3136.28) EXTHDR1.27@1727.53,3122.62 ; EXTHDR1.27@1721.87,3071.85 1721.87,3136.87 1741.1,3156.1 1741.1,3205.76 1735.41,3211.45 1731.86,3215 1731.86,3258.37 v1(1773.52,3300.04) ; v1@1764.02,3300.04 cw(c1741.09,3300.04) 1757.31,3283.82 cw(c1773.52,3267.61) v1@1773.52,3290.54 ; v1@1768.02,3300.04 cw(c1754.75,3300.04) 1764.13,3290.65 cw(c1773.52,3281.26) v1@1773.52,3294.54 ; v1@1957.62,3288.28 cw(c1941.4,3272.06) 1964.34,3272.06 cw(c1987.27,3272.06) v1@1971.06,3288.28 ; v1@1960.45,3291.11 cw(c1951.06,3281.72) 1964.34,3281.72 cw(c1977.62,3281.72) v1@1968.23,3291.11 ; v1(1964.34,3295) 1964.34,3202.39 R278.1@2006.7,3160.03 ; 1989.95,3176.78 ccw(c2006.7,3193.52) R278.1@2006.7,3169.84 ; 1991.14,3175.59 cw(c1976.07,3160.52) R278.1@1997.38,3160.52 ; R278.1@1996.78,3169.95 ccw(c2006.7,3179.87) R278.1@2006.7,3165.84 ; R278.1@1997.97,3168.76 cw(c1989.73,3160.52) R278.1@2001.38,3160.52 ; v3(5114.41,4032.52) U8.U7@5134.09,4052.2 ; U8.U7@5126.59,4052.2 cw(c5108.49,4052.2) 5121.29,4039.4 cw(c5134.09,4026.6) U8.U7@5134.09,4044.7 ; U8.U7@5126.75,4052.2 cw(c5109.03,4052.2) 5121.56,4039.67 cw(c5134.09,4027.14) U8.U7@5134.09,4044.86 ; 5127.21,4045.32 cw(c5114.41,4058.13) 5114.41,4040.02 ccw(c5114.41,4058.13) 5127.21,4045.32 ; 5127.21,4045.32 ccw(c5140.02,4032.52) 5121.91,4032.52 cw(c5140.02,4032.52) 5127.21,4045.32
  MidLayer2 w4: v1@1777.41,3296.15 cw(c1786.8,3286.76) 1786.8,3300.04 cw(c1786.8,3313.32) v1@1777.41,3303.93 ; v1@1780.24,3293.32 cw(c1796.46,3277.11) 1796.46,3300.04 ; v1@1780.24,3306.76 ccw(c1796.46,3322.98) 1796.46,3300.04 ; v1@1957.62,3288.28 ccw(c1941.4,3272.06) 1941.4,3295 ccw(c1941.4,3317.93) v1@1957.62,3301.72 ; v1@1960.45,3291.11 ccw(c1951.06,3281.72) 1951.06,3295 ccw(c1951.06,3308.28) v1@1960.45,3298.89 ; v1@1968.23,3291.11 cw(c1977.62,3281.72) 1977.62,3295 cw(c1977.62,3308.28) v1@1968.23,3298.89 ; v1@1971.06,3288.28 cw(c1987.27,3272.06) 1987.27,3295 cw(c1987.27,3317.93) v1@1971.06,3301.72 ; 5100.83,4021.13 cw(c5090.9,4031.06) 5090.9,4017.01 4997.36,4017.01 4870,4017.01 4860,4017.01 4807.16,4017.01 4760.19,3970.04 4721.67,3970.04 4648.64,4043.07 4608.33,4083.37 4312.21,4083.37 4278.88,4116.71 3640.19,4116.71 3606.86,4150.04 3423.52,4150.04 3415.19,4141.71 3415.19,3975.04 3406.86,3966.71 2631.86,3966.71 2615.19,3950.04 2615.19,3883.37 2598.52,3866.71 2448.52,3866.71 2415.19,3833.37 2415.19,3683.37 2398.52,3666.71 2048.52,3666.71 2031.86,3650.04 2031.86,3326.86 2000,3295 v1(1964.34,3295) 1905,3295 1899.96,3300.04 1796.46,3300.04 ; v3@5106.94,4033.17 cw(c5088.9,4034.75) 5100.54,4020.88 cw(c5112.18,4007.01) v3@5113.76,4025.05
IN.L: R2.2 R5.2 R6.2 R7.2 R137.1 TP9.1 U26.5 | length 4045
  Top Layer w4: U26.5@-389.13,5000 -314.44,5000 -294.44,4980 v1(-265,4980) v1@-269.96,4975.04 ; TP9.1@76.12,3508.23 125,3557.11 125,4284.85 296.85,4456.7 296.85,4576.85 v1(320,4600) ; v1@315.15,4600 v1(320,4600) ; v1@317.57,4597.57 v1(320,4600)
  MidLayer1 w4: v1@240.19,5008.37 240,5008.56 v1(240,5015) 315,5015 385,4945 385,4625 360,4600 v1(320,4600) 317.76,4602.24 v1@317.76,4602.61
  MidLayer2 w4: v1(-250,3760) -275,3735 -330,3735 -350,3715 -350,3645 -373.44,3621.56 -416.63,3621.56 -442,3596.18 -442,3535 -415.23,3508.23 TP9.1@76.12,3508.23
  Bottom Layer w4: R5.2@-278.82,3740.45 R5.2@-278.82,3741.71 ; R2.2@-278.82,3795.91 R5.2@-278.82,3741.71 ; v1@-263.56,4975.04 -265,4976.48 v1(-265,4980) -134.96,4980 -130,4975.04 -52,4975.04 ; v1@-255.01,3751.93 cw(c-260.62,3742.91) -250,3742.91 ; v1(-250,3760) -250,3742.91 ; v1@-244.99,3751.93 ccw(c-239.38,3742.91) -250,3742.91 ; R7.2@-221.18,3685 R6.2@-221.18,3740.45 -247.81,3740.45 -248.81,3741.45 -248.81,3741.71 R5.2@-278.82,3741.71 ; R137.1@-160.85,5388.42 -98.42,5388.42 -64.81,5354.81 -64.81,4987.85 -52,4975.04 ; v1(240,5015) 167.97,5015 126.01,4973.04 90,4973.04 88,4975.04 -52,4975.04
IN.R: R10.2 R11.2 R12.2 R13.2 R15.2 R138.1 TP10.1 U26.6 | length 3088.1
  Top Layer w4: U26.6@-389.09,4950.04 U26.6@-389.13,4950 -335,4950 v1(-320,4935)
  MidLayer1 w4: v1(-368.14,4308.37) -395,4335.23 -395,4430 -327.12,4497.88 -327.12,4583.19 -403.48,4659.54 -403.48,4766.49 -297.14,4872.82 -297.14,4912.14 v1(-320,4935) -319.83,4935.17 v1@-319.17,4935.17
  MidLayer2 w4: v1(-355,4020) -420,3955 -420,3724.88 -475,3669.88 -475,3505.68 -377.56,3408.23 TP10.1@76.12,3408.23 ; v1(-320,4935) -320,4988.5 -295,5013.5 -236.5,5013.5 -210,5040 -210,5255 -197.96,5267.04 v1(-126.14,5267.04)
  Bottom Layer w4: v1(-368.14,4308.37) -368.14,4267.37 -340.31,4239.55 R15.2@-321.18,4239.55 R13.2@-321.18,4184.09 ; v1(-355,4020) -352.73,4017.73 R10.2@-321.18,4017.73 R11.2@-321.18,4073.18 ; R138.1@-160.85,5276.75 -135.85,5276.75 v1(-126.14,5267.04) ; R11.2@-321.18,4073.18 R12.2@-321.18,4128.64 ; R11.2@-321.18,4073.18 R12.2@-321.18,4128.64 ; R11.2@-321.18,4073.18 R12.2@-321.18,4128.64 ; R12.2@-321.18,4128.64 R13.2@-321.18,4184.09 ; R12.2@-321.18,4128.64 R13.2@-321.18,4184.09 ; R12.2@-321.18,4128.64 R13.2@-321.18,4184.09
ISP176X.BUS_DMA_ACK: U8.AF12 U61.116 | length 1616.7
  Top Layer w4: U8.AF12@5325.64,3692.57 cw(c5312.84,3679.77) 5330.94,3679.77 cw(c5349.05,3679.77) U8.AF12@5336.25,3692.57 ; U8.AF12@5325.75,3692.68 cw(c5313.22,3680.15) 5330.94,3680.15 cw(c5348.67,3680.15) U8.AF12@5336.14,3692.68 ; v1(5330.19,3541.71) 5331.52,3541.71 5356.86,3567.04 5356.86,3575.04 5323.52,3608.37 5323.52,3630 5330.95,3637.43 5330.94,3658.37 5330.94,3660 5330.94,3670 U8.AF12@5330.94,3697.87 ; v1@5330.19,3547.21 ccw(c5330.19,3563.71) 5341.86,3552.04 ; v1@5330.19,3551.21 ccw(c5330.19,3577.36) 5348.69,3558.87 ; v1(5332.86,2919.04) 5332.86,2904.02 5326.86,2898.02 5326.86,2588.37 5431.86,2483.37 5456.86,2483.37 5472.93,2499.45 5472.93,2522.93 5478.2,2528.2 U61.116@5516.83,2528.2 ; v1@5339.69,3541.71 cw(c5359.4,3541.71) 5345.46,3555.65 ; U61.116@5500.81,2525.37 ccw(c5493.98,2518.54) 5493.98,2528.2 ccw(c5493.98,2537.85) U61.116@5500.81,2531.02
  MidLayer1 w4: v1@5320.69,3541.71 cw(c5297.76,3541.71) 5313.97,3525.49 cw(c5330.19,3509.27) v1@5330.19,3532.21 ; v1@5324.69,3541.71 cw(c5311.41,3541.71) 5320.8,3532.32 cw(c5330.19,3522.93) v1@5330.19,3536.21 ; v1(5330.19,3541.71) 5306.86,3518.37 5306.86,3276.39 5346.86,3236.39 5346.86,3147.37 5331.86,3132.37 5331.86,2925.04 5332.86,2924.04 v1(5332.86,2919.04)
ISP176X.BUS_DMA_REQ: U8.AF17 U61.114 | length 1930.2
  Top Layer w4: v1@5473.52,2580.21 cw(c5473.52,2557.27) 5489.74,2573.49 cw(c5505.96,2589.71) v1@5483.02,2589.71 ; v1@5473.52,2584.21 cw(c5473.52,2570.93) 5482.91,2580.32 cw(c5492.3,2589.71) v1@5479.02,2589.71 ; v1(5473.52,2589.71) 5495.67,2567.57 ; 5483.2,2580.03 ccw(c5503.64,2600.47) U61.114@5503.64,2571.57 ; 5490.03,2573.2 ccw(c5503.64,2586.81) U61.114@5503.64,2567.57 ; 5496.86,2566.37 ccw(c5503.64,2573.16) U61.114@5503.64,2563.57 ; v1(5498.52,3434.37) 5498.52,3433.37 5520.02,3454.87 5520.02,3482.6 5534.61,3497.19 5542.38,3497.19 5552.81,3507.62 5552.81,3567 5543.17,3576.65 5543.17,3618.21 5527.8,3633.58 5527.8,3660 5527.8,3670 U8.AF17@5527.8,3697.87 ; v1@5498.52,3439.87 ccw(c5498.52,3455.57) 5509.62,3444.47 ; v1@5498.52,3443.87 ccw(c5498.52,3469.22) 5516.45,3451.3 ; U61.114@5500.43,2565.17 ccw(c5495.67,2561.62) 5495.67,2567.57 ; U61.114@5500.43,2569.96 cw(c5495.67,2573.51) 5495.67,2567.57 ; v1@5504.02,3434.37 cw(c5514.89,3434.37) 5507.21,3442.06 ; v1@5508.02,3434.37 cw(c5528.54,3434.37) 5514.03,3448.89 ; U61.114@5516.83,2567.57 5495.67,2567.57 ; U8.AF17@5522.49,3692.57 cw(c5509.69,3679.77) 5527.8,3679.77 cw(c5545.9,3679.77) U8.AF17@5533.1,3692.57 ; 5527.8,3680.15 cw(c5545.52,3680.15) 5532.99,3692.68 ccw(c5545.52,3680.15) 5527.8,3680.15 ; 5527.8,3680.15 ccw(c5510.07,3680.15) 5522.6,3692.68 cw(c5510.07,3680.15) 5527.8,3680.15
  MidLayer1 w4: 5454.71,2621.86 cw(c5422.56,2589.71) v1@5468.02,2589.71 ; v1@5459.47,3009.99 cw(c5443.26,2993.77) 5466.19,2993.77 cw(c5489.13,2993.77) v1@5472.91,3009.99 ; 5461.54,2615.03 cw(c5436.21,2589.71) v1@5472.02,2589.71 ; v1@5462.3,3012.82 cw(c5452.91,3003.43) 5466.19,3003.43 cw(c5479.47,3003.43) v1@5470.08,3012.82 ; v1(5466.19,3016.71) 5466.19,2970.6 5438.09,2942.5 5437.75,2942.5 5427.5,2932.25 5427.5,2917.75 5435,2910.25 5435,2885 5413.52,2863.52 5413.52,2823 5451.52,2785 5451.52,2625.04 5473.52,2603.04 v1(5473.52,2589.71) ; 5468.36,2608.2 cw(c5449.87,2589.71) v1@5476.02,2589.71 ; 5475.19,2601.37 cw(c5463.53,2589.71) v1@5480.02,2589.71
  MidLayer2 w4: v1@5456.69,3016.71 ccw(c5433.76,3016.71) 5449.97,3032.93 ccw(c5466.19,3049.14) v1@5466.19,3026.21 ; v1@5460.69,3016.71 ccw(c5447.41,3016.71) 5456.8,3026.1 ccw(c5466.19,3035.49) v1@5466.19,3022.21 ; v1(5466.19,3016.71) 5431.86,3051.04 5431.86,3162.04 5404.52,3189.37 5404.52,3230.06 5415.19,3240.73 5415.19,3317.52 5437,3339.33 5437,3368.9 5417.5,3388.4 5417.5,3447.25 5427.75,3457.5 5475.4,3457.5 v1(5498.52,3434.37) ; v1@5489.02,3434.37 ccw(c5466.09,3434.37) 5482.31,3450.59 ccw(c5498.52,3466.81) v1@5498.52,3443.87 ; v1@5493.02,3434.37 ccw(c5479.75,3434.37) 5489.14,3443.76 ccw(c5498.52,3453.15) v1@5498.52,3439.87
ISP176X.BUS_NCS: U8.AA12 U61.106 | length 2574.5
  Top Layer w4: v1@5059.47,2919.32 ccw(c5043.26,2903.11) 5043.26,2926.04 ccw(c5043.26,2948.98) v1@5059.47,2932.76 ; v1@5062.3,2922.15 ccw(c5052.91,2912.76) 5052.91,2926.04 ccw(c5052.91,2939.32) v1@5062.3,2929.93 ; v1@5072.52,2926.04 v1(5066.19,2926.04) 5031.09,2926.04 5022.52,2917.48 5022.52,2878.61 5056.13,2845 5153.56,2845 5165.19,2833.37 5165.19,2791.71 5173.52,2783.37 5198.86,2783.37 v1(5215.19,2767.04) ; v1@5205.69,2767.04 ccw(c5182.76,2767.04) 5198.97,2783.26 ccw(c5215.19,2799.48) v1@5215.19,2776.54 ; v1@5209.69,2767.04 ccw(c5196.41,2767.04) 5205.8,2776.43 ccw(c5215.19,2785.82) v1@5215.19,2772.54 ; v3(5311.26,3875.04) U8.AA12@5330.94,3894.72 ; U8.AA12@5323.44,3894.72 cw(c5305.34,3894.72) 5318.14,3881.92 cw(c5330.94,3869.12) U8.AA12@5330.94,3887.22 ; U8.AA12@5323.6,3894.72 cw(c5305.88,3894.72) 5318.41,3882.19 cw(c5330.94,3869.66) U8.AA12@5330.94,3887.38 ; U61.106@5523.52,2725.04 5546.19,2725.04 v1(5601.52,2669.71) ; U61.106@5532.85,2722.22 cw(c5539.67,2715.4) 5539.67,2725.04 cw(c5539.69,2734.71) U61.106@5532.85,2727.87 ; v1@5592.02,2669.71 ccw(c5569.09,2669.71) 5585.31,2685.93 ccw(c5601.52,2702.14) v1@5601.52,2679.21 ; v1@5596.02,2669.71 ccw(c5582.75,2669.71) 5592.14,2679.1 ccw(c5601.52,2688.49) v1@5601.52,2675.21 ; 5324.06,3887.84 ccw(c5336.87,3875.04) 5318.76,3875.04 cw(c5336.87,3875.04) 5324.06,3887.84 ; 5324.06,3887.84 cw(c5311.26,3900.65) 5311.26,3882.54 ccw(c5311.26,3900.65) 5324.06,3887.84
  MidLayer1 w4: v1(5066.19,2926.04) 5097.52,2957.37 5097.52,2979.9 5165.48,3047.86 5165.48,3064.6 ; v1@5066.19,2931.54 ccw(c5066.19,2944.82) 5075.58,2935.43 ccw(c5084.97,2926.04) v1@5071.69,2926.04 ; v1@5066.19,2935.54 ccw(c5066.19,2958.48) 5082.41,2942.26 ccw(c5098.63,2926.04) v1@5075.69,2926.04 ; 5165.04,3064.6 5165.04,3105 5165.04,3105.42 5184.67,3125.04 ; 5185,3125.37 5184.67,3125.04 ; 5287.4,3798.23 5287.4,3812.16 ; v3@5303.79,3874.39 cw(c5285.75,3872.81) 5299.62,3861.17 ; v3@5311.91,3867.57 ccw(c5313.49,3849.53) 5299.62,3861.17 ; 5184.67,3125.04 5277.52,3125.04 5290.19,3137.71 5290.19,3154.37 5239.86,3204.71 5239.86,3497.36 5259.21,3516.71 5270,3516.71 5281.86,3528.56 5281.86,3545 5287.4,3550.54 5287.4,3660 5287.4,3670 5287.4,3718.62 5287.4,3738.04 5287.4,3812.16 ; 5287.4,3812.16 5287.4,3831.66 cw(c5329.13,3831.66) 5299.62,3861.17
  Bottom Layer w4: v1@5210.21,2758.95 cw(c5204.73,2750.04) 5215.19,2750.04 ; v1(5215.19,2767.04) 5215.19,2750.04 ; v1@5220.17,2758.95 ccw(c5225.65,2750.04) 5215.19,2750.04 ; v1@5592.02,2669.71 cw(c5569.09,2669.71) 5585.31,2653.49 cw(c5601.52,2637.27) v1@5601.52,2660.21 ; v1@5596.02,2669.71 cw(c5582.75,2669.71) 5592.14,2660.32 cw(c5601.52,2650.93) v1@5601.52,2664.21 ; v1(5601.52,2669.71) 5548.52,2616.71 5348.52,2616.71 5215.19,2750.04
ISP176X.BUS_NIRQ: U8.AF15 U61.112 | length 1826.5
  Top Layer w4: U8.AF15@5443.75,3692.57 cw(c5430.95,3679.77) 5449.06,3679.77 cw(c5467.16,3679.77) U8.AF15@5454.36,3692.57 ; U8.AF15@5443.86,3692.68 cw(c5431.33,3680.15) 5449.06,3680.15 cw(c5466.78,3680.15) U8.AF15@5454.25,3692.68 ; U8.AF15@5449.06,3697.87 5449.06,3670 5449.06,3660 5449.06,3629.14 5453.19,3625 5453.19,3608.37 5420.86,3576.04 5415.7,3570.89 5415.7,3437.16 5410,3431.46 5410,3401.31 5436.31,3375 5436.31,3338.64 5423.02,3325.35 5423.02,3256.98 5438.91,3241.09 5489.08,3241.09 5538.96,3191.21 5611.02,3191.21 5618.86,3183.37 5618.86,3166.71 5628.19,3157.37 5640.19,3157.37 5648.52,3149.04 5648.52,3090.37 5665.19,3073.71 5665.19,3008.37 5623.52,2966.71 5590.19,2966.71 5548.52,2925.04 5495.15,2925.04 5482.38,2937.81 5466.92,2937.81 5462.23,2942.5 5404.15,2942.5 5375.88,2914.23 5354.38,2914.23 5334.86,2894.71 5334.86,2630.37 5348.52,2616.71 5490.19,2616.71 5498.52,2608.37 U61.112@5516.83,2608.37 ; 5492.03,2614.87 ccw(c5501.77,2624.61) U61.112@5503.22,2610.91 ; U61.112@5497.95,2608.95 ccw(c5502.9,2613.9) U61.112@5503.64,2606.94
ISP176X.ISP176X_NRESET: U8.AF9 U61.122 | length 2065.2
  Top Layer w4: v1@5065.19,3015.54 cw(c5065.19,2992.61) 5081.41,3008.82 cw(c5097.63,3025.04) v1@5074.69,3025.04 ; v1@5065.19,3019.54 cw(c5065.19,3006.26) 5074.58,3015.65 cw(c5083.97,3025.04) v1@5070.69,3025.04 ; v1(5065.19,3025.04) 5097.52,2992.71 5097.52,2934.37 5111.9,2920 5215,2920 5248.52,2886.48 5248.52,2491.71 5315.19,2425.04 5398.52,2425.04 5413.48,2410.09 U61.122@5516.83,2410.09 ; v1@5183.47,3473.43 ccw(c5167.26,3489.64) 5190.19,3489.64 ccw(c5213.13,3489.64) v1@5196.91,3473.43 ; v1@5186.3,3470.6 ccw(c5176.91,3479.99) 5190.19,3479.99 ccw(c5203.47,3479.99) v1@5194.08,3470.6 ; v1(5190.19,3466.71) 5190.19,3495.06 5206.02,3510.9 5206.02,3577.16 5201.02,3582.16 5201.02,3609.92 5212.83,3621.73 5212.83,3660 5212.83,3670 U8.AF9@5212.83,3697.87 ; U8.AF9@5207.53,3692.57 cw(c5194.73,3679.77) 5212.83,3679.77 cw(c5230.94,3679.77) U8.AF9@5218.14,3692.57 ; U8.AF9@5207.64,3692.68 cw(c5195.11,3680.15) 5212.83,3680.15 cw(c5230.56,3680.15) U8.AF9@5218.03,3692.68 ; U61.122@5500.81,2407.26 ccw(c5493.98,2400.43) 5493.98,2410.09 ccw(c5493.98,2419.74) U61.122@5500.81,2412.91
  MidLayer2 w4: v1(5065.19,3025.04) 5065.19,3033.37 5098.52,3066.71 5098.52,3133.37 5098.52,3171.33 5231.86,3304.67 5231.86,3425.04 v1(5190.19,3466.71) ; v1@5066.69,3025.04 cw(c5090.43,3025.04) 5073.64,3041.83 ; v1@5070.69,3025.04 cw(c5104.09,3025.04) 5080.47,3048.66 ; v1@5074.69,3025.04 cw(c5117.75,3025.04) 5087.3,3055.49 ; v1@5190.19,3457.21 cw(c5190.19,3434.27) 5206.41,3450.49 cw(c5222.63,3466.71) v1@5199.69,3466.71 ; v1@5190.19,3461.21 cw(c5190.19,3447.93) 5199.58,3457.32 cw(c5208.97,3466.71) v1@5195.69,3466.71
JTAG.DETECT: EXTHDR1.23 R233.2 | length 3135.4
  Top Layer w4: EXTHDR1.23@1779.21,3122.62 ccw(c1765.55,3136.28) 1784.87,3136.28 ccw(c1804.18,3136.28) EXTHDR1.23@1790.52,3122.62 ; EXTHDR1.23@1784.87,3071.85 1784.87,3274.87 1827.04,3317.04 2264.25,3317.04 2370,3211.29 2370,3170 2472,3068 2472,2447 2460,2435 2460,2221.31 2501.31,2180 2766.31,2180 2822.81,2236.5 2857.19,2236.5 2913.69,2180 3116.63,2180 3150,2180 3165.19,2195.19 3165.19,2322 3145,2342.19 v1(3145,2370) ; v1@3138.28,2363.28 cw(c3122.06,2347.06) 3145,2347.06 cw(c3167.93,2347.06) v1@3151.72,2363.28 ; v1@3141.11,2366.11 cw(c3131.72,2356.72) 3145,2356.72 cw(c3158.28,2356.72) v1@3148.89,2366.11
  Bottom Layer w4: R233.2@3097.23,2442.92 cw(c3083.79,2429.48) 3102.8,2429.48 ; 3102.8,2424.54 cw(c3128.78,2424.54) R233.2@3110.41,2442.92 ; 3102.8,2434.2 cw(c3119.12,2434.2) R233.2@3107.58,2445.75 ; R233.2@3103.82,2450 3102.8,2448.98 3102.8,2412.2 v1(3145,2370) ; v1@3135.5,2370 ccw(c3112.56,2370) 3128.78,2386.22 ccw(c3145,2402.43) v1@3145,2379.5 ; v1@3139.5,2370 ccw(c3126.22,2370) 3135.61,2379.39 ccw(c3145,2388.78) v1@3145,2375.5
JTAG.HARD.TCK: EXTHDR1.11 R223.2 | length 1849.4
  Top Layer w4: EXTHDR1.11@1973.84,3018.73 cw(c1973.84,3004.27) 1984.07,3014.49 ; EXTHDR1.11@1973.84,3071.85 1973.84,3024.72 v1(2006.86,2991.71) ; EXTHDR1.11@1977.84,3026.73 ccw(c1992.35,3026.73) 1982.09,3016.47 ; EXTHDR1.11@1981.84,3026.73 ccw(c2006.01,3026.73) 1988.92,3009.64 ; v1@1997.36,2991.71 ccw(c1974.42,2991.71) 1990.64,3007.93 ccw(c2006.86,3024.14) v1@2006.86,3001.21 ; v1@2001.36,2991.71 ccw(c1988.08,2991.71) 1997.47,3001.1 ccw(c2006.86,3010.49) v1@2006.86,2997.21
  MidLayer1 w4: v1@2000.14,2984.99 cw(c1983.92,2968.77) 2006.86,2968.77 cw(c2029.79,2968.77) v1@2013.57,2984.99 ; v1@2002.97,2987.82 cw(c1993.58,2978.43) 2006.86,2978.43 cw(c2020.14,2978.43) v1@2010.75,2987.82 ; v1(2006.86,2991.71) 2006.86,2831.67 2006.86,2817.32 2132.47,2691.71 2220,2691.71 2956.86,2691.71 v1(3106.86,2841.71) ; v1@3097.36,2841.71 cw(c3074.42,2841.71) 3090.64,2825.49 cw(c3106.86,2809.27) v1@3106.86,2832.21 ; v1@3101.36,2841.71 cw(c3088.08,2841.71) 3097.47,2832.32 cw(c3106.86,2822.93) v1@3106.86,2836.21
  Bottom Layer w4: R223.2@3097.23,2877.92 cw(c3081.32,2862.01) 3103.82,2862.01 cw(c3126.32,2862.01) R223.2@3110.41,2877.92 ; R223.2@3100.06,2880.75 cw(c3090.98,2871.67) 3103.82,2871.67 cw(c3116.66,2871.67) R223.2@3107.58,2880.75 ; v1@3100.14,2848.43 ccw(c3091.26,2857.31) 3103.82,2857.31 ; 3103.82,2862.32 ccw(c3127.47,2862.32) v1@3110.75,2845.6 ; 3103.82,2871.98 ccw(c3137.13,2871.98) v1@3113.57,2848.43 ; R223.2@3103.82,2885 3103.82,2844.75 v1(3106.86,2841.71)
JTAG.HARD.TDI: EXTHDR1.7 R220.2 | length 1474
  Top Layer w4: EXTHDR1.7@2031.18,3122.62 ccw(c2017.52,3136.28) 2036.83,3136.28 ccw(c2056.15,3136.28) EXTHDR1.7@2042.49,3122.62 ; v1@2033.47,3136.32 cw(c2025.36,3128.21) 2036.83,3128.21 ; EXTHDR1.7@2036.83,3071.85 2036.83,3139.68 v1(2040.19,3143.04) ; EXTHDR1.7@2036.83,3112 cw(c2071.23,3112) v1@2046.91,3136.32 ; EXTHDR1.7@2036.83,3121.66 cw(c2061.57,3121.66) v1@2044.08,3139.15 ; 2036.83,3131.32 cw(c2051.91,3131.32) v1@2041.25,3141.98
  Bottom Layer w4: v1(2040.19,3143.04) 2114.19,3217.04 2724.67,3217.04 2934,3007.71 3081.53,3007.71 R220.2@3103.82,3030 R220.2@3103.82,3028.82 ; v1@2040.19,3148.54 ccw(c2040.19,3161.82) 2049.58,3152.43 ccw(c2058.97,3143.04) v1@2045.69,3143.04 ; v1@2040.19,3152.54 ccw(c2040.19,3175.48) 2056.41,3159.26 ccw(c2072.63,3143.04) v1@2049.69,3143.04 ; 3087.07,3013.25 cw(c3103.82,2996.5) R220.2@3103.82,3020.19 ; 3088.26,3014.44 ccw(c3073.19,3029.51) R220.2@3094.5,3029.51 ; R220.2@3093.9,3020.08 cw(c3103.82,3010.16) R220.2@3103.82,3024.19 ; R220.2@3095.09,3021.27 ccw(c3086.85,3029.51) R220.2@3098.5,3029.51
JTAG.HARD.TDO: EXTHDR1.9 R221.2 | length 1432.4
  Top Layer w4: EXTHDR1.9@2005.34,3018.73 cw(c2005.34,3007.07) 2013.58,3015.31 ; EXTHDR1.9@2005.34,3071.85 2005.34,3023.56 v1(2040.19,2988.71) ; EXTHDR1.9@2009.34,3026.73 ccw(c2026.65,3026.73) 2014.41,3014.49 ; EXTHDR1.9@2013.34,3026.73 ccw(c2040.3,3026.73) 2021.24,3007.66 ; v1@2030.69,2988.71 ccw(c2007.76,2988.71) 2023.97,3004.93 ccw(c2040.19,3021.14) v1@2040.19,2998.21 ; v1@2034.69,2988.71 ccw(c2021.41,2988.71) 2030.8,2998.1 ccw(c2040.19,3007.49) v1@2040.19,2994.21
  Bottom Layer w4: v1(2040.19,2988.71) 2077.19,3025.71 2243.54,3025.71 2269.25,3000 2296.31,3000 2313.69,3017.37 2877.63,3017.37 2919.63,2975.37 3057.12,2975.37 3075,2957.5 R221.2@3103.82,2957.5 ; v1@2040.19,2994.21 ccw(c2040.19,3007.49) 2049.58,2998.1 ccw(c2058.97,2988.71) v1@2045.69,2988.71 ; v1@2040.19,2998.21 ccw(c2040.19,3021.14) 2056.41,3004.93 ccw(c2072.63,2988.71) v1@2049.69,2988.71 ; R221.2@3097.23,2950.91 ccw(c3081.32,2935) 3081.32,2957.5 ccw(c3081.32,2980) R221.2@3097.23,2964.09 ; R221.2@3100.06,2953.74 ccw(c3090.98,2944.66) 3090.98,2957.5 ccw(c3090.98,2970.34) R221.2@3100.06,2961.26